# Altium PCB Mega2560_Custom.PcbDoc (part 6 of 6)
Units mil, origin at the board's own origin, x right, y up, seen from the top; angles counter-clockwise.
Board outline 4742.41 x 2889.95 mil, 2 copper layers (Top Layer, Bottom Layer), stack 57 mil thick; 213 components, 133 nets, 789 pads, 812 vias.
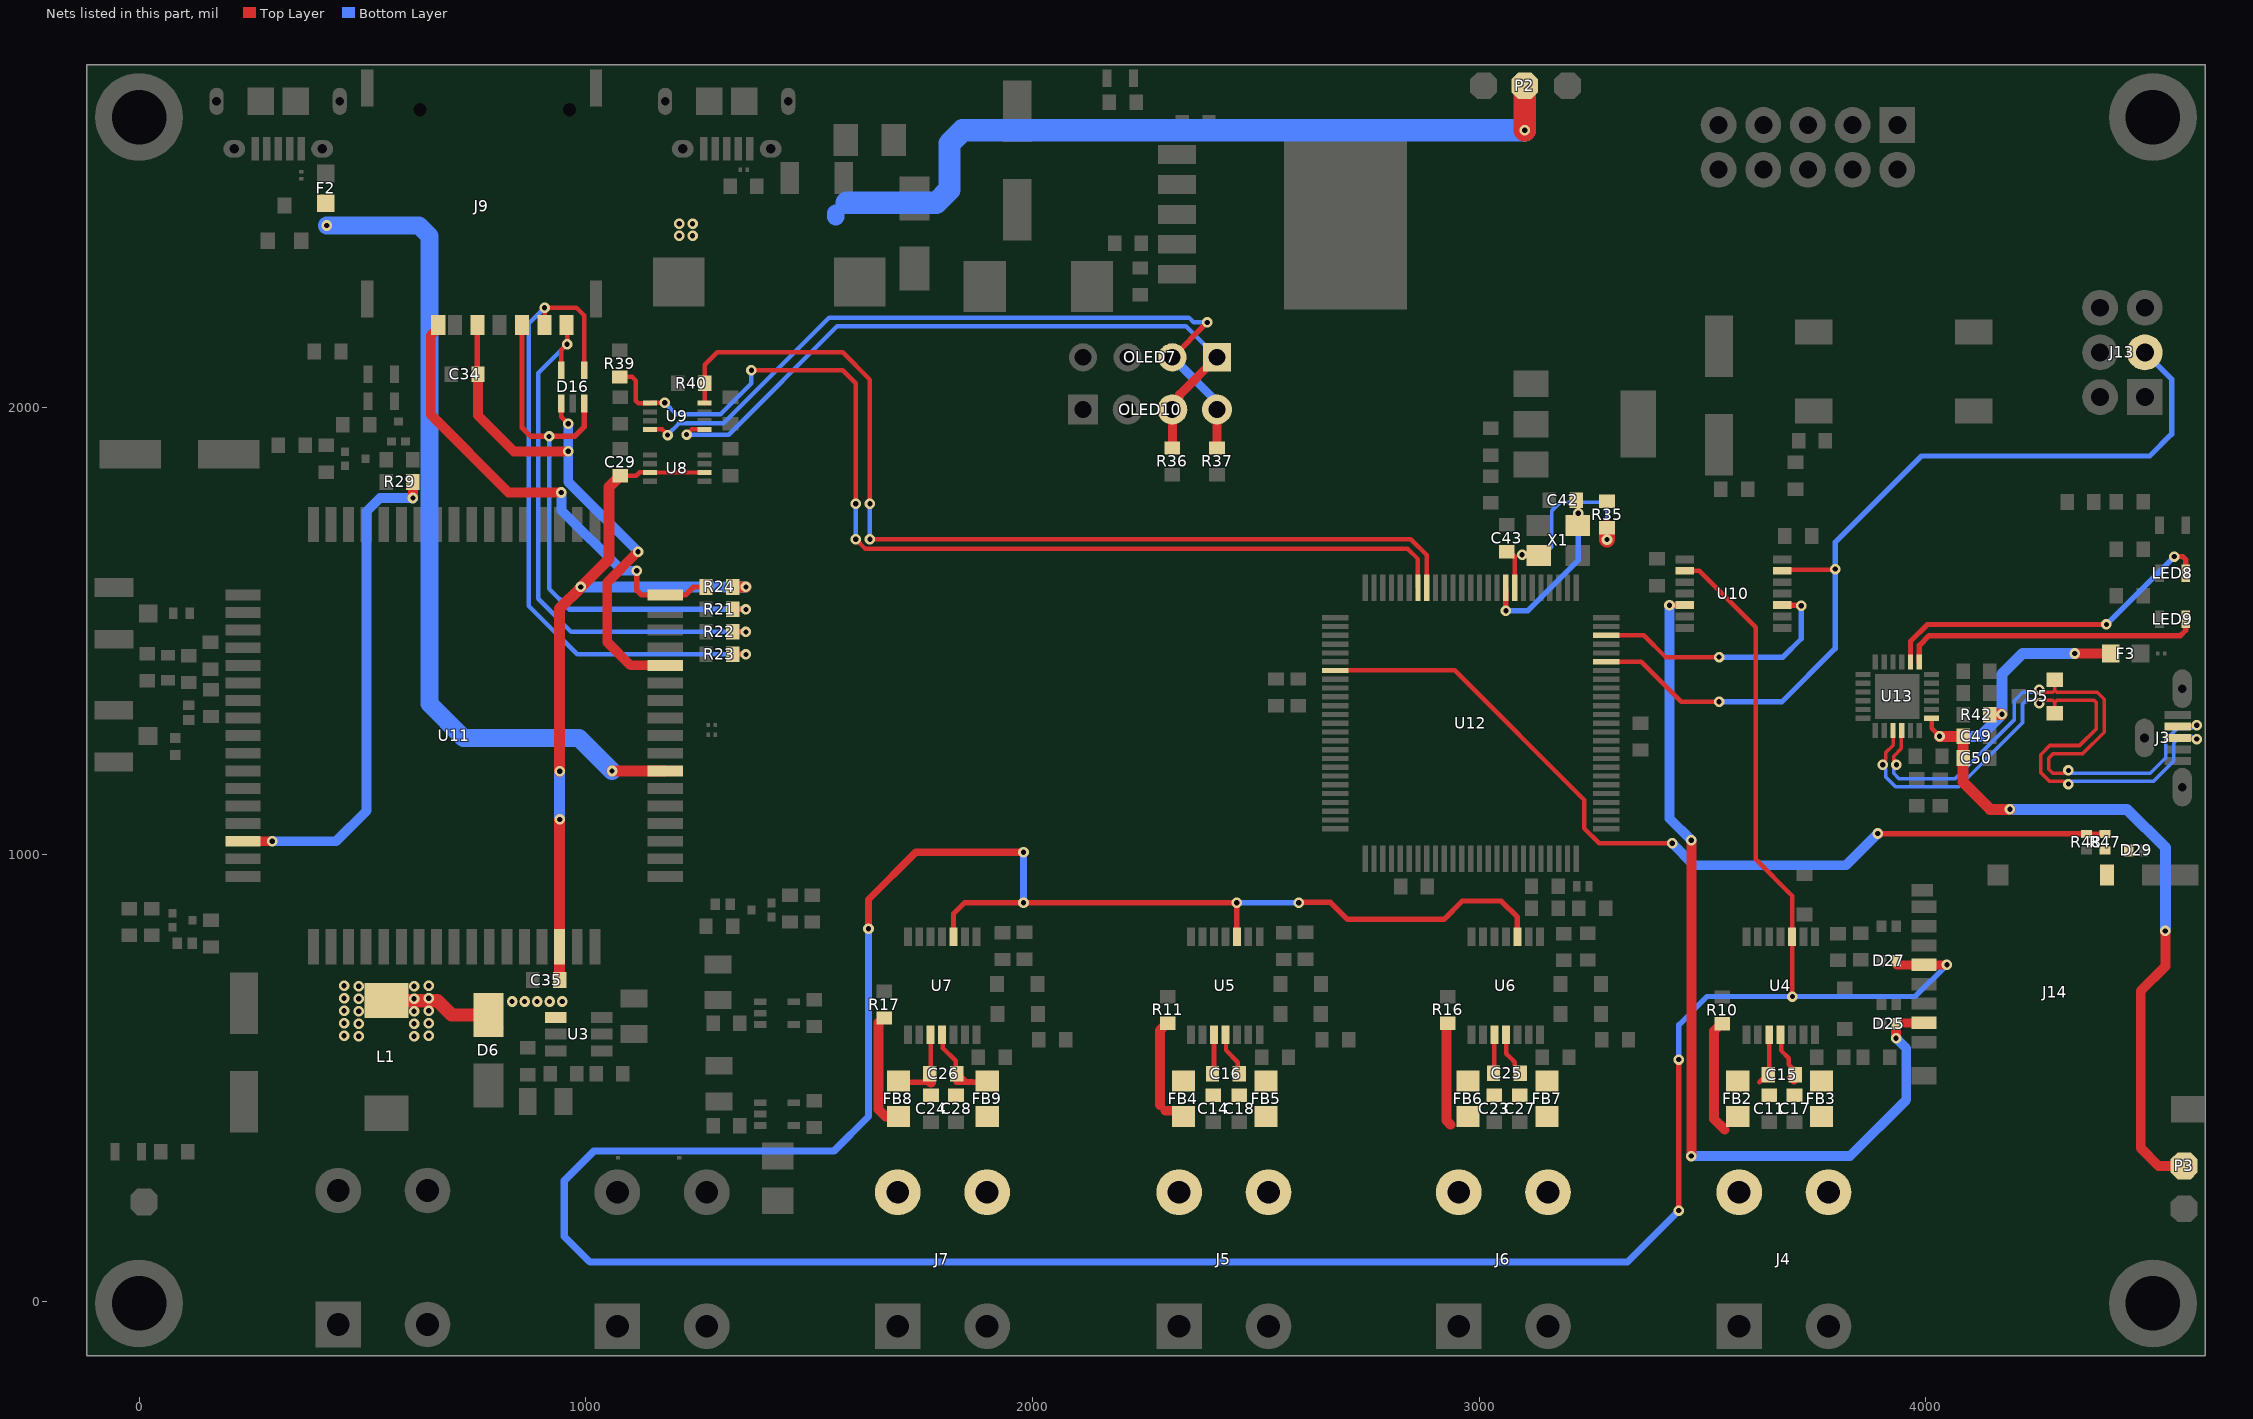
[diagram p3: the nets of this part, all layers, seen from the top]

## Via types
v1: diameter 23.62, hole 11.81, Top Layer to Bottom Layer, 812 vias

## Nets (pads, with @x,y where several pads share a name; then routed paths per layer and width w, separated by ;. In a path a pad name is that pad's centre, name@x,y a point inside that pad or via, vN(x,y) a via of type N, cw(c..) or ccw(c..) an arc to the next point about the centre after c; other vN are vias at no path point) (continued)
RXLED: LED9.2 U13.13 | length 675.3
  Top Layer w12: U13.13@3985.17,1430.85 3985.17,1468.17 4007,1490 4569.5,1490 4581.53,1502.03 LED9.2@4581.53,1527
  Top Layer w16: LED9.2@4579.69,1525.16 LED9.2@4581.53,1527
SCK: J13.3 U10.13 U12.20 | length 2022.6
  Top Layer w10: U12.20@3283.97,1431.59 3362.41,1431.59 3452.05,1341.95 v1(3536.82,1341.95) ; U10.13@3678.07,1635.13 3679.98,1637.04 3798.91,1637.04 v1@3800.82,1638.95
  Bottom Layer w12: v1(3536.82,1341.95) 3677.82,1341.95 3796.82,1460.95 v1(3796.82,1638.95) 3796.82,1698.82 3990,1892 4500.87,1892 4549.82,1940.95 4549.82,2063.95 J13.3@4489.82,2123.95
SCK_3.3V: D27.1 J14.5 U4.10 U5.10 U6.10 U7.10 U10.2 | length 8170.6
  Top Layer w10: U10.2@3459.57,1635.13 3492.64,1635.13 3619,1508.77 3619,989.15 3700.27,907.88 U4.10@3700.27,815.41 3701,814.68 v1(3701,682)
  Top Layer w12: U7.10@1823.23,815.41 1823.23,867.36 1847.82,891.95 v1(1979.82,891.95) ; v1@1979.87,892 v1(2457,892) ; U5.10@2457.41,815.41 v1@2457.41,891.59 ; v1(2596,892) 2596.94,892.94 2667.06,892.94 2705,855 2921,855 2962,896 3049,896 3085.27,859.73 U6.10@3085.27,815.41 ; v1(3446.82,202.95) v1(3446.82,540.95)
  Top Layer w16: v1(1632.82,833.51) 1632.82,899.23 1738.54,1004.95 v1(1979.82,1004.95)
  Top Layer w20: D27.1@3934.74,752.96 J14.5@3995.52,752.97 v1(4046.82,752.95)
  Bottom Layer w12: v1(2457,892) v1(2596,892) ; v1(3446.82,540.95) 3446.82,618.82 3510,682 v1(3701,682) 3975.87,682 v1(4046.82,752.95)
  Bottom Layer w16: v1(1632.82,833.51) 1632.82,413.82 1554.95,335.95 1017.88,335.95 951.82,269.89 951.82,145.18 1009.05,87.95 3331.82,87.95 v1(3446.82,202.95) ; v1@1979.82,890.95 v1(1979.82,1004.95)
SCL_3.3V: OLED7.1 OLED10.3 R36.1 U9.5 | length 1606.6
  Top Layer w10: v1(1225.5,1939.95) 1236.97,1951.42 U9.5@1265.85,1951.42
  Top Layer w20: R36.1@2313,1910 OLED10.3@2313,1996 2313,2008.69 2329.38,2025.07 2329.38,2029.37 OLED7.1@2413,2113
  Bottom Layer w10: v1(1225.5,1939.95) 1319.82,1939.95 1562.82,2182.95 2343.05,2182.95 OLED7.1@2413,2113
SCL_5V: R40.1 U9.8 U12.43 | length 2184.2
  Top Layer w10: U9.8@1265.85,2010.48 1265.85,2054.85 R40.1@1266,2055 1266,2096 1294,2124 1575,2124 1636,2063 v1(1636,1785) ; v1(1636,1706) 2815,1706 2847,1706 2882.4,1670.6 U12.43@2882.4,1596.95
  Bottom Layer w10: v1(1636,1706) v1(1636,1785)
SD_CS: U10.10 U12.23 | length 591.3
  Top Layer w10: U12.23@3283.97,1490.65 3368.35,1490.65 3417.05,1441.95 v1(3536.82,1441.95)
  Top Layer w12: U10.10@3678.07,1558.36 3678.78,1557.65 3720.12,1557.65 v1(3720.82,1556.95)
  Bottom Layer w12: v1(3536.82,1441.95) 3679.82,1441.95 3720.82,1482.95 v1(3720.82,1556.95)
SD_CS_3.3V: D25.1 J14.2 U10.5 | length 2054.5
  Top Layer w12: v1(3425.82,1557.95) 3426.03,1558.15 3459.37,1558.15 U10.5@3459.57,1558.36
  Top Layer w20: D25.1@3938.95,623.05 J14.2@3995.52,623.05
  Top Layer w22: v1(3474.82,324.95) v1(3474.82,1031.81) ; v1(3933,589) D25.1@3933,619.27
  Bottom Layer w22: v1@3425.82,1557.51 3425.82,1080.81 v1(3474.82,1031.81) ; v1(3474.82,324.95) 3829.95,324.95 3956,451 3956,566 v1(3933,589)
SD_DET: D29.1 J14.SW-A R47.1
SDA_3.3V: OLED7.2 OLED10.4 R37.1 U9.4 | length 1720.9
  Top Layer w10: U9.4@1143.8,1951.42 1170.85,1951.42 1183,1939.27 v1(1183,1939)
  Top Layer w12: OLED7.2@2313,2113 v1(2391,2191)
  Top Layer w20: R37.1@2413,1910 OLED10.4@2413,1996
  Bottom Layer w10: v1(1183,1939) 1183,1939.44 1208.51,1964.95 1307.82,1964.95 1544.82,2201.95 2350.2,2201.95 2361.16,2191 v1(2391,2191)
  Bottom Layer w20: OLED7.2@2313,2113 2404.02,2021.89 2404.02,2004.98 OLED10.4@2413,1996
SDA_5V: R39.1 U9.1 U12.44 | length 2348.7
  Top Layer w10: R39.1@1076,2069 1104,2069 1112,2061 1112,2016.07 1117.86,2010.21 U9.1@1143.8,2010.21 ; U9.1@1144.27,2010.95 v1(1176.82,2010.95) ; v1(1370.82,2083.95) 1575.05,2083.95 1604,2055 v1(1604,1785) ; v1(1604,1706) 1626,1684 2840,1684 2862.71,1661.29 U12.44@2862.71,1596.95
  Bottom Layer w10: v1(1176.82,2010.95) 1201.82,1985.95 1301.82,1985.95 1370.82,2054.95 v1(1370.82,2083.95) ; v1(1604,1706) v1(1604,1785)
SDMMC_DET: R47.2 R48.1 U12.57 | length 1973
  Top Layer w10: U12.57@2677.67,1412.17 2944.83,1412.17 3235,1122 3235,1058.39 3268.44,1024.95 v1(3431.81,1024.95) v1@3433,1024.95
  Top Layer w12: v1(3892,1047) 3892.37,1046.63 4357.78,1046.63 4358.96,1045.45 R47.2@4400.96,1045.45
  Bottom Layer w22: v1@3431.5,1025.5 3481.05,975.95 3820.95,975.95 v1(3892,1047)
SIM_CLK: D16.5 J9.C3 R22.1 | length 1231.2
  Top Layer w10: D16.5@945.23,2084.35 945.23,2129.23 v1(958,2142) ; J9.C3@957.13,2185.45 958,2184.58 v1@958,2138.31
  Top Layer w12: R22.1@1329.18,1498.28 v1(1358.38,1498.28)
  Bottom Layer w10: v1(958,2142) 893.82,2077.82 893.82,1572.18 967.72,1498.28 v1(1358.38,1498.28)
SIM_DATA: D16.4 J9.C7 R23.1 | length 1498.7
  Top Layer w10: J9.C7@907.82,2186.15 v1(907.82,2223.95) 979.05,2223.95 996.41,2206.59 D16.4@996.41,2084.35
  Top Layer w12: R23.1@1329.18,1447.95 v1(1358.38,1447.95)
  Bottom Layer w10: v1(907.82,2223.95) 871.82,2187.95 871.82,1556.95 980.82,1447.95 v1(1358.38,1447.95)
SIM_DET: J9.CD R24.2 U11.34 | length 1047.2
  Top Layer w12: v1(1114,1635.31) 1114,1592 1125.05,1580.95 U11.34@1177.7,1580.95 1222.95,1580.95 1240.95,1598.95 R24.2@1269.18,1598.95
  Top Layer w22: J9.CD@669.73,2185.45 669.73,2178.76 653,2162.03 653,1984.7 827.3,1810.4 v1(945.27,1810.4)
  Bottom Layer w22: v1(945.27,1810.4) 945.58,1810.09 945.58,1770.42 1080.69,1635.31 v1(1114,1635.31)
SIM_RST: D16.3 J9.C2 R21.1 | length 1268.2
  Top Layer w12: J9.C2@857.13,2185.45 857.13,1955.64 876.82,1935.95 v1(917.82,1935.95) 974.95,1935.95 996.41,1957.41 D16.3@996.41,2009.55 ; R21.1@1329.18,1548.62 v1(1358.38,1548.62)
  Bottom Layer w10: v1(917.82,1935.95) 917.82,1594.95 942.39,1570.39
  Bottom Layer w12: 942.39,1570.39 964.16,1548.62 v1(1358.38,1548.62)
SIM_VDD: C34.2 D16.1 J9.C1 U11.30 | length 1223.5
  Top Layer w10: C34.2@757.13,2076.64 C34.2@758.82,2074.95 ; D16.1@945.23,2009.55 945.03,2009.34 945.03,1979.74 v1(960.82,1963.95)
  Top Layer w12: C34.2@757.13,2076.64 J9.C1@757.13,2185.45
  Top Layer w22: C34.2@758.82,2074.95 758.82,1982.95 839.32,1902.45 v1(960.82,1902.45) ; v1(1117,1678) 1048,1609 1048,1476 1100.53,1423.47 U11.30@1177.7,1423.47
  Bottom Layer w22: v1(960.82,1963.95) v1(960.82,1902.45) 960.82,1834.18 v1(1117,1678)
STATUS: R29.2 U11.66 | length 1126.9
  Top Layer w22: U11.66@232.82,1029.77 v1(298,1029.77) ; v1(613,1798) R29.2@613,1834
  Bottom Layer w22: v1(298,1029.77) 440.77,1029.77 508.82,1097.82 508.82,1767.82 539,1798 v1(613,1798)
SW_12V: D6.2 L1.2 U3.1 | length 279.7
  Top Layer w30: L1.2@553.82,672.93 668.07,672.93 700.31,640.69 D6.2@781.82,640.69 781.82,628.46 D6.2@800.29,610
  other v1: 492,593 615.65,593 459,594 648.65,594 492,621 615.65,621 459,622 648.65,622 492,649 615.65,649 459,650 648.65,650 835,671 863,671 891,671 919,671 947,671 492,677 615.65,677 459,678 648.65,678 492,705 615.65,705 459,706 648.65,706
TH1_CON+: FB3.1 J4.4 | length 2.8
  Top Layer w40: FB3.1@3765.82,413.95 FB3.1@3766.82,412.95 ; J4.4@3780.82,244.95 J4.4@3781.82,243.95
TH1_CON-: FB2.1 J4.2 R10.1 | length 256.1
  Top Layer w22: R10.1@3543.82,620.95 3541.32,620.95 3525.42,605.05 3525.42,408.22 3549.64,384
TH1_T+: C15.2 C17.1 FB3.2 U4.4 | length 124.1
  Top Layer w10: U4.4@3675.67,582.92 3675.67,561.33 3692.91,544.09 3692.91,529.95 3701.88,520.97 3706,520.97 3698.05,520.97 3698.05,509.46 C15.2@3705.89,501.62 ; C15.2@3693.32,499.95 3703.32,489.95 C15.2@3705.82,489.95
TH1_T-: C11.2 C15.1 FB2.2 U4.3 | length 103.2
  Top Layer w10: 3626.87,489.91 3649.09,512.13 U4.3@3649.09,583.91
TH2_CON+: FB7.1 J6.4
TH2_CON-: FB6.1 J6.2 R16.1 | length 234.5
  Top Layer w22: R16.1@2927.32,621.95 R16.1@2929.82,621.95 2926.81,618.94 2926.81,404.19 2936,395
TH2_T+: C25.2 C27.1 FB7.2 U6.4 | length 93.8
  Top Layer w10: U6.4@3060.67,582.92 3060.67,554.15 3068.66,546.16 3079.56,535.25 3079.56,512.95 C25.2@3090.89,501.62
TH2_T-: C23.2 C25.1 FB6.2 U6.3 | length 73.9
  Top Layer w10: C25.1@3034.09,510 U6.3@3034.09,583.91
TH3_CON+: FB5.1 J5.4 | length 4.8
  Top Layer w40: J5.4@2522.82,247.35 J5.4@2526.22,243.95
TH3_CON-: FB4.1 J5.2 R11.1 | length 249.7
  Top Layer w22: 2285,439.18 2285,606.63 2300.32,621.95 R11.1@2302.82,621.95 ; 2297.89,426.29 2322.84,426.29 2334.12,415 FB4.1@2334.12,414.25
  Top Layer w40: J5.2@2326.22,243.95 J5.2@2337.82,255.55
TH3_T+: C16.2 C18.1 FB5.2 U5.4 | length 88.1
  Top Layer w10: U5.4@2432.8,582.92 2433.08,582.65 2433.08,561.78 2459.57,535.29 2459.57,516.43 C16.2@2467,509
TH3_T-: C14.2 C16.1 FB4.2 U5.3 | length 88.2
  Top Layer w10: C16.1@2406.23,509.77 C16.1@2407,509
  Top Layer w12: C16.1@2406.23,509.77 U5.3@2406.23,596.91
TH4_CON+: FB9.1 J7.4 | length 0.6
  Top Layer w40: J7.4@1898.42,243.95 J7.4@1898.62,244.15 ; FB9.1@1898.62,413.75 FB9.1@1898.82,413.95
TH4_CON-: FB8.1 J7.2 R17.1 | length 263.4
  Top Layer w22: 1655.02,441.81 1655.02,428.95 1670.72,413.25 FB8.1@1699.12,413.25 ; 1655,441.84 1655,623.63 1665.32,633.95 R17.1@1667.82,633.95
  Top Layer w40: J7.2@1698.42,243.95 J7.2@1699.12,244.65
TH4_T+: C26.2 C28.1 FB9.2 U7.4 | length 199.4
  Top Layer w8: FB9.2@1896.08,489.95 FB9.2@1898.82,492.69
  Top Layer w10: U7.4@1797.64,583.91 1799.24,582.31 1799.24,566.76 1827.86,538.14 1827.86,511.14 C26.2@1830,509 1830,491.13 1828.82,489.95 ; C26.2@1842.99,501.62 1851.66,492.95 1865.8,492.95
  Top Layer w12: 1828.82,489.95 1859.82,489.95 ; 1865.8,489.95 FB9.2@1896.08,489.95
TH4_T-: C24.2 C26.1 FB8.2 U7.3 | length 136.9
  Top Layer w10: C26.1@1772.05,509 U7.3@1772.05,583.91
  Top Layer w12: FB8.2@1699.82,489.95 1759.82,489.95
  Top Layer w22: 1771.41,490.36 1772.82,488.95
TXLED: LED8.2 U13.14 | length 774.2
  Top Layer w12: U13.14@3965.35,1430.72 3965.35,1477.35 4003,1515 v1(4404,1515) ; v1(4556,1667) 4574.5,1667 4581.53,1659.97 LED8.2@4581.53,1630
  Bottom Layer w12: v1(4404,1515) v1(4556,1667)
USB_D_N: D5.2 J3.2 U13.4 | length 1389.1
  Top Layer w8: 3927.51,1211.49 3927.51,1220.07 3944.82,1237.38 3944.82,1276.33 U13.4@3945.67,1277.18 ; v1(4253.82,1369.26) 4258.05,1369.26 4264.36,1362.95 4283.51,1362.95 4288.19,1367.63 ; D5.2@4288.19,1391.35 4288.19,1367.63 ; v1(4318.82,1188.26) 4314.6,1188.26 4308.28,1181.95 4283.82,1181.95 4274.82,1190.95 4274.82,1215.95 4284.82,1225.95 4351.28,1225.95 4398.82,1273.49 4398.82,1347.72 4383.59,1362.95 4292.88,1362.95 4288.19,1367.63 ; J3.2@4563.82,1286.54 4565.08,1287.8 4604.56,1287.8 v1(4605.82,1289.05)
  Bottom Layer w8: v1(3933.82,1200.95) 3933.82,1196.72 3927.51,1190.41 3927.51,1181.82 3939.39,1169.95 4065.82,1169.95 4198,1302.13 4198,1344.13 4216.82,1362.95 4243.28,1362.95 ; v1@4326.35,1181.95 4501.82,1181.95 4536.82,1216.95 4536.82,1256.4 4563.16,1282.74 4595.28,1282.74 4601.6,1289.05 v1(4605.82,1289.05)
USB_D_P: D5.1 J3.3 U13.3 | length 1418.9
  Top Layer w8: 3909.51,1211.49 3909.51,1227.53 3926.82,1244.84 3926.82,1276.33 U13.3@3925.98,1277.18 ; v1(4253.82,1338.64) 4258.05,1338.64 4264.36,1344.95 4283.51,1344.95 4288.19,1340.26 ; D5.1@4288.19,1316.55 4288.19,1340.26 ; v1(4318.82,1157.64) 4314.6,1157.64 4308.28,1163.95 4276.37,1163.95 4256.82,1183.49 4256.82,1223.4 4277.37,1243.95 4343.82,1243.95 4380.82,1280.95 4380.82,1340.26 4376.14,1344.95 4292.88,1344.95 4288.19,1340.26 ; J3.3@4563.82,1260.95 4565.08,1259.69 4604.56,1259.69 v1(4605.82,1258.43)
  Bottom Layer w8: v1(3903.2,1200.95) 3903.2,1196.72 3909.51,1190.41 3909.51,1174.37 3931.93,1151.95 4073.28,1151.95 4216,1294.67 4216,1336.67 4224.28,1344.95 4243.28,1344.95 ; v1@4326.35,1163.95 4509.28,1163.95 4554.82,1209.49 4554.82,1248.95 4570.62,1264.74 4595.28,1264.74 4601.6,1258.43 v1(4605.82,1258.43)
USB_PRGM: C49.1 C50.1 F3.2 P3.1 R42.2 U13.7 | length 2064.7
  Top Layer w10: U13.7@4012.59,1304.74 4012.59,1282.41 v1(4030.5,1264.5)
  Top Layer w22: v1@4333.03,1449.97 F3.2@4413.36,1449.95 ; 4480.82,694.77 4480.82,342.95 4520.82,302.95 P3.1@4577.82,302.95 ; 4481.31,694.77 4481.62,694.77 4482.36,695.52 4482.36,696.31 4535.82,749.77 v1(4535.82,828.95)
  Top Layer w25: v1(4030.5,1264.5) C49.1@4083,1264.5 C50.1@4083,1216 4083,1162 4144,1101 v1(4188,1101) ; R42.2@4143,1313 4144,1314 v1(4170,1314)
  Bottom Layer w25: v1(4030.5,1264.5) 4120.5,1264.5 v1(4170,1314) 4170,1404 4216,1450 v1(4333,1450) ; v1(4188,1101) 4450,1101 4535.82,1015.18 v1(4535.82,828.95)
USB_VBUS: F2.2 P2.1 U11.24 | length 3629.2
  Top Layer w22: v1(1058.82,1186.95) v1@1058.97,1187.1 ; U11.24@1177.55,1187.1 U11.24@1177.7,1187.25
  Top Layer w25: v1@1058.97,1187.1 U11.24@1177.55,1187.1
  Top Layer w50: v1(3101.82,2620.95) P2.1@3101.82,2720.95
  Bottom Layer w40: v1(420,2408) 626.57,2408 650,2384.57 650,1337.43 726.43,1261 984.77,1261 v1(1058.82,1186.95) ; 1559.5,2427.5 1559.5,2434.5
  Bottom Layer w50: 1584.25,2459 1784.71,2459 1814,2488.29 1814,2591.66 1843.29,2620.95 v1(3101.82,2620.95)
  other v1: 1209.18,2384.95 1239,2384.95 1209.18,2412 1239,2412
VDD_EXT: C29.1 C35.2 R24.1 U8.3 U8.6 U11.15 | length 1775.6
  Top Layer w10: C29.1@1076.82,1847.95 1112.82,1847.95 1120.46,1855.58 1143.32,1855.58 U8.3@1143.8,1855.11 U8.6@1265.85,1855.11
  Top Layer w25: C35.2@941.48,719 U11.15@941.48,793.55 v1(941.48,1078.61) ; v1(941.48,1186.29) 941.48,1550.48 v1@989,1598 ; v1(989,1598.95) 1051.82,1661.77 1051.82,1822.95 1071.82,1842.95 1071.82,1845.45 1074.32,1847.95 C29.1@1076.82,1847.95 ; R24.1@1329.18,1598.95 v1(1358.38,1598.95)
  Bottom Layer w25: v1(941.48,1078.61) v1(941.48,1186.29) ; v1@989.95,1598.95 v1(1358.38,1598.95)
XTAL1: C42.2 R35.2 U12.34 X1.1 | length 364.9
  Top Layer w12: U12.34@3059.56,1596.95 3059.66,1596.85 3059.66,1546.11 v1(3059.82,1545.95)
  Bottom Layer w12: v1(3059.82,1545.95) 3108.82,1545.95 3222,1659.13 3222,1693 ; 3221.82,1693 v1(3221.82,1763.82)
XTAL2: C43.1 R35.1 U12.33 X1.3 | length 462.2
  Top Layer w10: C43.1@3077,1670 3079.25,1667.75 U12.33@3079.25,1596.95
  Top Layer w35: v1(3286,1705) R35.1@3286,1731
  Bottom Layer w8: v1(3095.82,1670.95) 3144.82,1670.95 3161.82,1687.95 3161.82,1768.82 3182,1789 3272,1789 3286,1775 v1(3286,1705)
pads on no net: J1.2 J1.3 J1.4 J2.4 J3.4 J4.1 J4.3 J5.1 J5.3 J6.1 J6.3 J7.1 J7.3 J9.C6 J9.MH J11.1 J11.3 J12.7 J12.8 J14.1 J14.8 J15.1 J15.3 SW1.2 SW1.4 U3.6 U4.6 U4.13 U5.6 U5.13 U6.6 U6.13 U7.6 U7.13 U10.6 U10. U11.3 U11.4 U11.5 U11.6 U11.7 U11.8 U11.11 U11.12 U11.13 U11.14 U11.19 U11.20 U11.21 U11.22 U11.23 U11.25 U11.26 U11.35 U11.36 U11.37 U11.38 U11.40 U11.41 U11.42 U11.43 U11.44 U11.47 U11.48 U11.49 U11.50 U11.51 U11.67 U11.68 U12.1 U12.4 U12.5 U12.6 U12.7 U12.8 U12.9 U12.12 U12.13 U12.14 U12.15 U12.16 U12.17 U12.18 U12.19 U12.24 U12.25 U12.27 U12.28 U12.29 U12.35 U12.36 U12.37 U12.38 U12.39 U12.40 U12.41 U12.42 U12.47 U12.48 U12.49 U12.50 U12.51 U12.52 U12.58 U12.59 U12.60 U12.63 U12.64 U12.65 U12.66 U12.67 U12.68 U12.69 U12.70 U12.79 U12.82 U12.83 U12.84 U12.85 U12.86 U12.87 U12.88 U12.89 U12.94 U12.95 U13.1 U13.10 U13.11 U13.12 U13.15 U13.16 U13.17 U13.18 U13.19 U13.22 U13.24
copper on no net:
  other v1: 4248.05,577.77 3961,1578 3961,1685 257.77,2515.72

## Polygon pours and split planes (outlines as drawn)
GND on Top Layer "GND_L02_P001" (solid, remove dead copper, pour order 4): -16,-23 -16,2670 4527,2670 4527,-23
GND on Bottom Layer "GND_L02_P001" (solid, remove dead copper, pour order 0): -16,-23 -16,2670 4527,2670 4527,-23

## Other copper
Top Layer:
  region net 3.3V: 4372,691 4372,724 3968,724 3968,691
  region net 3.3V: 4370,398 4370,441 3867,441 3867,398
  region net 3.3V: 4613,172 4613,240 4333.96,240 4333.96,172
  rectangle net 3.3V: 4334.13,197 4376.13,1028
  rectangle net SCL_3.3V: 2277,1893 2351,2037
  rectangle net SDA_3.3V: 2377,1893 2451,2034
  rectangle net 12V: -30,178 499,303
  rectangle net SIM_DET: 641,2151 686,2210
  rectangle net SIM_VDD: 739,2013 777,2209
  region net 3.3V: 2859,1819 2859,1877 1895,1877 1895,1819
  rectangle net 3.3V: 2790,1844.15 2859,1999
  rectangle net USB_VBUS: 1107.73,2368 1174.73,2535
  region net USB_VBUS: 1117.15,2435.27 1117.15,2368.27 1270.15,2368.27 1270.15,2435.27
  region net GND: 967.44,2289.9 967.44,2234 1047,2234 1047,2289.9
  region net GSM_PWR: 611,2449 543,2449 543,2296 611,2296
  region net USB_VBUS: 527.9,2481.56 394,2481.56 394,2387.56 527.9,2387.56
  rectangle net GSM_PWR: 968,2298 1094,2431
  rectangle net GSM_PWR: 543,2394 1094,2455
  rectangle net GND: 365.82,2201.95 528,2288
  rectangle net GND: 2065,1948 2158,2163
  rectangle net 3.3V: 2174,1839 2257.18,2152
  rectangle net GND: 3883,503 3906,621
  rectangle net GND: 1001,2615 1192,2674
  rectangle net GND: 4127,1338 4230,1381
  rectangle net ADC1/IN: 1376,437.07 1437,473
  rectangle net ADC0/IN: 1376,663.07 1437,699
  region net GND: 930,436 930,332 1084.07,332 1084.07,436
  rectangle net 5V: 3335,1207.05 3501,1250.82
  region net 5V: 1528.95,494 1451,494 1451,433 1528.95,433
  region net ADC0: 1301,603 1301,694 1268,694 1268,603
  rectangle net ADC1/IN: 1251.62,227.95 1465,262.95
  region net ADC1/IN: 1290,325 1185,325 1185,301 1290,301
  region net ADC1/IN: 1289.62,224.95 1289.62,325 1254.62,325 1254.62,224.95
  region net 5V: 1613,730 1451,730 1451,659 1613,659
  region net ADC1: 1301,374 1301,467 1268,467 1268,374
  region net ADC0/IN: 1089,220 1089,326 1054,326 1054,220
  rectangle net 5V: 3236.18,909.05 3377,949
  region net 5VACC: 3204,949 3204,863 3231,863 3231,949
  region net 5V: 3334.05,1250.82 3334.05,1143 3386,1143 3386,1250.82
  region net GND: 3303,2058.95 3030.82,2058.95 3030.82,2020.95 3303,2020.95
  region net GND: 3042.95,1933.18 3042.95,2189 3004.95,2189 3004.95,1933.18
  rectangle net GND: 1300.18,1830.05 1390,1868.05
  region net GND: 1353.05,1981.82 1353.05,1833 1391.05,1833 1391.05,1981.82
  region net NetD12_2: 3301,783 3222,783 3222,744 3301,744
  rectangle net GND: 3131,745 3210,784
  rectangle net GND: 357,1838 471,1880
  rectangle net NetQ1_1: 357,1892 471,1934
  region net GND: 630,1866 630,1935 586,1935 586,1866
  region net NetQ2_1: 575,1816 575,1934.95 536,1934.95 536,1816
  region net GNSS_ANT: 35,1434 35,1562 -1,1562 -1,1434
  region net GSM_PWR: 132,1323 132,1378 87,1378 87,1323
  rectangle net NetL3_2: 0,1369.95 82,1410
  rectangle net NetL3_1: 48,1425.95 130,1463
  rectangle net GSM_PWR: 142,1369 257,1438
  rectangle net GND: 1406.69,880.98 1475,933
  rectangle net NetQ4_1: 1406.69,833 1524,870.92
  rectangle net GND: 1008,663 1115.69,699
  rectangle net NetQ3_1: -40.54,859 84,899
  rectangle net GND: 10,781 97,847
  rectangle net GNSS_ANT: 7.82,1517 90.82,1562
  region net NetD2_2: 443,2545 398,2545 398,2496 443,2496
  region net NetD2_2: 443,2523 443,2545 352,2545 352,2523
  rectangle net NetD2_2: 352,2525 374,2607
  region net GSM_PWR_EN: 2419,2656 2419,2468 2452,2468 2452,2656
  region net GSM_PWR_EN: 2444,2656 2373,2656 2373,2610 2444,2610
  region net 5V: 2361,2571 2361,2656 2280,2656 2280,2571
  rectangle net 5V: 2280,2544 2408,2590
  rectangle net GSM_PWR: 2080,2212 2264,2283
  rectangle net NetC55_2: 1355,2506 1381,2616
  rectangle net NetD3_2: 4465,1431 4523,1469
  rectangle net NetD3_2: 4521,1302 4595,1322
  rectangle net GND: 4531,1328 4609,1473
  rectangle net NetD7_1: 1525,2228 1782,2385
  rectangle net GND: 2213.82,2711.95 2314.82,2762.95
  rectangle net NetLED2_1: 2125,2660.95 2190.82,2762.95
  region net GSM_PWR: 2313,2705 2212,2705 2212,2661 2313,2661
  rectangle net 5V: 1874,2367 1999,2533
  rectangle net 5V: 1793,2367 1881,2580.52
  rectangle net 5V: 1873,2458 2054,2580.52
  rectangle net GND: 1834,2588.95 2082,2759.95
  rectangle net 5V: 1660,2549 1823,2636
  region net GND: 1945,2110 1945,2335.82 1840,2335.82 1840,2110
  rectangle net NetD7_1: 2099,2338 2158,2385
  rectangle net USB_VBUS: 395,2389 444,2479
  region net NetLED9_1: 4535,1503 4535,1597 4470,1597 4470,1503
  rectangle net NetJ13_2: 4327,1977 4439,2078
  rectangle net GND: 3883,603 3915,857
  rectangle net GND: 1254,819 1301,903
  rectangle net TH4_CON-: 1644,610 1691,650
  rectangle net TH3_CON-: 2274,598 2325,638
  rectangle net TH1_CON-: 3514.42,597 3566.17,637
  rectangle net 3.3V: 1859.82,526 1912.96,567
  rectangle net NetD15_2: 1866.14,572.95 1938.14,662.95
  rectangle net D\R\D\Y\4\: 1989,564 2033,664
  rectangle net 3.3V: 2494,526 2547.14,567
  rectangle net NetD11_2: 2499.14,572.95 2571.14,662.95
  rectangle net D\R\D\Y\3\: 2622,564 2666,664
  rectangle net TH2_CON-: 2899.62,598 2954,638
  rectangle net 3.3V: 3121.86,526 3175,567
  rectangle net NetD14_2: 3127,574 3199,664
  rectangle net D\R\D\Y\2\: 3249,564 3293,664
  rectangle net CS2: 3224,690 3288,734
  rectangle net GND: 3800.86,489.94 3906,514
  rectangle net GND: 3900,489.94 3946,565.94
  rectangle net TH1_T+: 3684.82,507 3727.18,534.95
  rectangle net TH2_T+: 3069.82,510 3110.86,528
  rectangle net TH4_T+: 1807.82,510.07 1848.86,528.07
  rectangle net TH3_T+: 2441.96,509 2483,527
  rectangle net SCK_3.3V: 3923,742.96 3957,776.96
  rectangle net GND: 3015.82,381.95 3111.82,436
  rectangle net GND: 2387,377.95 2483,417.95
  rectangle net SW_12V: 443,582 816,719
  rectangle net 5V: 406.18,320 703,540
  region net GND: 1207,699 1073,699 1073,637 1207,637
  rectangle net 5V: 1098,551 1179,586
  region net 5V: 1179,627 1073,627 1073,577 1179,577
  region net SW_12V: 961,686 806,686 806,621 961,621
  region net FB_12V: 938,490 938,574 899,574 899,490
  rectangle net GND: 951,409 1042,529
  rectangle net 12V: 718,514 845,542
  rectangle net FB_12V: 852,543 958,574
  rectangle net GND: 4477,926 4612,1060
  rectangle net GND: 4430.82,1044 4612,1216.95
  rectangle net GSM_PWR: 370,1980 421,2178
  rectangle net GSM_PWR: 210,1943 471,2026
  rectangle net NRESET: 1312,819 1381,904
  rectangle net USB_PRGM: 4001.82,1253 4051,1311
  rectangle net GND: 1626,2419 1775.85,2535
  rectangle net GND: 3321,1278 3381,1314
  rectangle net 5V: 2523,1279 2615,1350
  rectangle net 5V: 3671,1651.95 3714,1833
  region net NetLED8_1: 4535,1606 4535,1704 4470,1704 4470,1606
  rectangle net CP_VDD: 4404,1558 4443,1703
  rectangle net XTAL2: 3268.5,1715 3303.5,1751
  rectangle net XTAL1: 3192,1771 3307,1814.95
  rectangle net GND: 1183,2475 1350,2542
  rectangle net NetC55_2: 1355,2475 1478,2543
  rectangle net NetF1_2: 1540,2478 1614,2635
  rectangle net 5V: 1056,2112 1229,2210
  rectangle net 5V: 1299,2006 1350,2101
  rectangle net GSM_PWR: 1057,2228 1270,2358.95
  rectangle net USB_VBUS: 466,2474 1123,2535
  rectangle net VDD_EXT: 1039,1813.95 1098.82,1869.95
  rectangle net 3.3V: 3077,1919 3321,2002
  rectangle net 5V: 3004,1831 3253,1907.95
  rectangle net GND: -101,1578 51,2069.71
  rectangle net GND: 96,570 370,683
  rectangle net 12V: 741,483 817,542
  rectangle net 3.3V: 3376.94,1650.95 3484.82,1690
  rectangle net 3.3V: 3339,1798.95 3569,2040
  rectangle net GSM_PWR: 118,1667 186,1794
  rectangle net NetD7_1: 2279,2467 2405,2529
  rectangle net GSM_PWR: 118,1781 272,2027
  rectangle net 3.3V: 4311.82,996.76 4372.82,1027.76
  rectangle net GND: 294,596 370,706
  rectangle net GND: 96,587 319,742.95
  rectangle net GND: 3018,2054 3575.82,2576.95
  rectangle net GND: 2787.82,2186 3049.82,2576.95
  region net GND: -43.18,390.95 -75.18,390.95 -75.18,310.95 -43.18,310.95
  region net NetLED1_1: 68,357 -5.18,357 -5.18,310.95 68,310.95
  rectangle net 5V: 697,313.95 883.82,403
  rectangle net 5V: 1142,2031 1229,2210
  region net GND: 1369.82,1982.95 1302.82,1982.95 1302.82,1944.95 1369.82,1944.95
  rectangle net GND: 4567.82,437.95 4609.82,937.95
  rectangle net GND: 2463.82,2183 2839.82,2691.95
  rectangle net GND: 4430.82,1192.95 4514.82,1292.95
  rectangle net GND: 3575,1800.95 3633,2075.95
  rectangle net 3.3V: 3127.04,791 3262,840
  rectangle net GND: 1010.82,2008.95 1094.82,2039.95
  rectangle net GND: 1009,2008.95 1047,2284
  rectangle net GND: 1000,2652 1849,2709.95
  rectangle net GND: 1183,2531.95 1273.82,2666.95
  rectangle net GND: 153.97,2533.95 268.82,2634.95
  region net GND: 557,2634.95 384.03,2634.95 384.03,2556 557,2556
  rectangle net GND: 153.97,2620.95 557,2709.95
  rectangle net NetLED6_1: 4470,1716 4533,1808
  rectangle net NetJ13_2: 4358,1766 4399,2068
  rectangle net GND: 3472.82,2054.52 3803.82,2427.95
  rectangle net TH1_CON+: 3736.42,191.95 3838,439.95
  rectangle net TH1_CON+: 3729.42,191.95 3754.42,298.95
  region net TH1_CON-: 3612,438 3514.42,438 3514.42,191.95 3612,191.95
  region net TH1_CON-: 3634.22,298.95 3596,298.95 3596,191.95 3634.22,191.95
  rectangle net TH2_CON+: 3122.62,191.95 3212.62,439.95
  rectangle net TH2_CON+: 3101.62,191.95 3126.62,298.95
  region net TH2_CON-: 3006.42,439 2899.62,439 2899.62,191.95 3006.42,191.95
  region net TH2_CON-: 3006.42,298.95 2981.42,298.95 2981.42,191.95 3006.42,191.95
  rectangle net TH4_CON+: 1867.02,191.95 1957.02,439.95
  rectangle net TH4_CON+: 1846.02,191.95 1871.02,298.95
  region net TH4_CON-: 1740,438 1644.02,438 1644.02,191.95 1740,191.95
  region net TH4_CON-: 1750.82,298.95 1725.82,298.95 1725.82,191.95 1750.82,191.95
  region net TH3_CON-: 2380.62,298.95 2355.62,298.95 2355.62,191.95 2380.62,191.95
  region net TH3_CON-: 2369,439.95 2273.82,439.95 2273.82,191.95 2369,191.95
  rectangle net TH3_CON+: 2475.82,191.95 2500.82,298.95
  rectangle net TH3_CON+: 2495.82,191.95 2585.82,438
  rectangle net 5V: 3615,1651.95 3700.82,1734.95
  rectangle net XTAL2: 3043.82,1644.95 3161.82,1692.95
  rectangle net GND: 2898,1711.95 3161.21,1816
  rectangle net GND: 3156.82,1763.95 3174.82,1814.95
  rectangle net GND: 3134,1711.95 3174.82,1814.95
  rectangle net XTAL1: 3191.82,1711.95 3247.82,1814.95
  rectangle net R\E\S\E\T\: 3677,1960.95 3801,2022.95
  rectangle net R\E\S\E\T\: 3677,1863 3731.82,1990.95
  rectangle net GND: 3842.82,1087.95 3874.82,1247.95
  rectangle net GND: 3842.82,1087.95 4052.82,1128.95
  rectangle net GND: 3629,383 3725,423
  region net TH1_T-: 3670.87,534.95 3549.87,534.95 3549.87,445.95 3670.87,445.95
  rectangle net TH1_T+: 3684.82,445.95 3794,517.95
  region net TH2_T-: 3055.87,530 2946,530 2946,448 3055.87,448
  rectangle net TH2_T+: 3069.82,446 3179,517.95
  region net TH3_T-: 2428,527 2307,527 2307,445 2428,445
  rectangle net TH3_T+: 2441.96,445 2554,517.95
  rectangle net TH4_T+: 1807.82,446 1925.82,517
  region net TH4_T-: 1793.82,530 1672.82,530 1672.82,446 1793.82,446
  rectangle net 3.3V: 2499.82,790 2630,841
  rectangle net GND: 1753.4,377.95 1849.4,417.95
  rectangle net 3.3V: 1865.82,787.95 2060,841
  rectangle net CP_VDD: 3959.82,1152.95 4054.82,1239
  rectangle net CP_VDD: 4012.82,1152.95 4054.82,1237.95
  rectangle net CP_VDD: 3959.82,1153.95 3991.82,1292.95
  rectangle net GND: 4136.82,909.3 4184.82,934.95
  rectangle net SD_DET: 4387,930.17 4466,1028.98
  rectangle net 5V: 1288.67,1880 1344.82,1926.95
  region net GSM_PWR: 2091,2326 2010,2326 2010,2212 2091,2212
  rectangle net GND: 153.97,2696.95 1850,2759.95
  region net GND: 114.33,1172.95 114.33,1227.92 -86.67,1227.92 -86.67,1172.95
  rectangle net GND: -100.18,1301.95 -13.18,1502.95
  rectangle net GND: 1007.82,663 1064.82,829.95
  rectangle net 12V: 718,415 891.82,525
  rectangle net 12V: 91,224 368.44,540
  rectangle net 3.3V: 3742.82,794 3874,844
  rectangle net GND: 573.82,1613.95 639.82,1778.95
  rectangle net GND: 64.82,1050.95 275.82,1240.95
  rectangle net GSM_PWR: 87,1353 181,1410
  rectangle net GSM_PWR: 188,1368.95 318,1480.95
  rectangle net RF_ANT: 12.82,1249.36 272.82,1281.36
  rectangle net NetC39_1: 97,1524.95 272.82,1556.95
  region net NetLED4_2: 599,1959 599,2038.95 560,2038.95 560,1959
  rectangle net GSM_FB: 2218.82,2293.95 2262.82,2356.95
  rectangle net GSM_FB: 2218.82,2336.95 2372.82,2392.95
  pour cut-out: 39,1640 39,1152 -114,1152 -114,1640
  pour cut-out: 1140.46,2213.82 1343.23,2082.71 1480.29,2082.71 1686.46,2216.02 1686.46,2347.29 1485.95,2474.71 1337.54,2474.71 1140.46,2347.29
Bottom Layer:
  rectangle net GSM_PWR: 374,2287 611,2370
  rectangle net GND: 2070,1951 2156,2130
  rectangle net 5V: 2519,1279.95 2750,1353
  rectangle net 3.3V: 2790,1922 3247,1999
  rectangle net 5V: 2976,1802 3310,1910
  rectangle net GND: 2896,1711 2969,1817
  rectangle net 5V: 1870,2431 2406.68,2554.95
  rectangle net 5V: 1870,2522.95 2406.68,2587.95
  rectangle net GND: 1837,2095 2156,2169
  rectangle net SW_12V: 816,621 962,687
  rectangle net SW_12V: 443,582 828.47,719
  rectangle net 5V: 1084,551 1179,627
  rectangle net GND: 4554,966 4613,1023
  rectangle net GND: 308,597.95 349,705
  rectangle net GND: 1000,2620 1273.82,2762.95
  rectangle net GND: 158,2682 465,2719
  rectangle net 5V: 2395,2519 3219,2588
  rectangle net 5V: 2164,2214 2406,2449
  rectangle net USB_VBUS: 1187,2369 1595,2486
  rectangle net GND: 3565,1838.95 3639,2024
  rectangle net 5V: 3605,1651 3714,1740
  rectangle net GND: 3401,2111 3607,2237
  rectangle net GSM_PWR: 116,1667 185,1719
  rectangle net GSM_PWR: 229,1934 469.82,2028
  rectangle net NetD7_1: 1621,2336 2157,2392
  rectangle net 3.3V: 3403,1646 3518,2022
  rectangle net GND: 2853.58,2218 3002,2513
  rectangle net GSM_PWR: 119,1801 236,2028
  rectangle net GND: -81,1788 42,1994
  rectangle net 12V: 147.82,416.95 780.82,540
  rectangle net GND: 4545.82,1312.02 4609.24,1415.95
  rectangle net GND: 4463.82,1312.02 4609.24,1373
  region net GND: 4520.44,1325.58 4463.82,1325.58 4463.82,1217.95 4520.44,1217.95
  rectangle net 5V: 1076,1901 1105.82,2254
  rectangle net 5V: 1080.82,1901 1333.82,1922
  rectangle net GND: 2860.82,2218.95 3292.82,2514
  rectangle net GND: 3008,2115 3293.82,2377.95
  rectangle net GND: 1246.82,2637.95 1683.82,2762.95
  rectangle net GND: 2308.82,2653.95 2839.82,2762.95
  rectangle net 5V: 3741.82,1949.95 3857.82,2030.95
  rectangle net GND: 1627,2654.05 2083,2722
  rectangle net GSM_PWR: 1187,2260 1256,2358.95
  rectangle net GSM_PWR: 1200.82,2260.95 2081,2330
  rectangle net 5V: 1080.82,2047.95 1300.82,2255
  rectangle net GND: 1571,2652 2375,2762.95
  rectangle net GND: 1178,2497 1769,2709.95
  rectangle net 12V: 53.82,184 514,421.95
  rectangle net 5V: 534,313.95 883.82,403.95
  rectangle net 12V: 760,416.95 857,542
  rectangle net GND: 99,597.95 312,743.95
  rectangle net 12V: 53.82,296.95 314.82,540
  rectangle net GSM_PWR: 374,1968.95 469.82,2370
  rectangle net GND: 364.82,1291 414.82,1513.95
  rectangle net GSM_PWR: 99.82,1364.95 318,1483.95
  pour cut-out: 1140.46,2214.82 1343.23,2083.71 1480.29,2083.71 1686.46,2217.02 1686.46,2348.29 1485.95,2475.71 1337.54,2475.71 1140.46,2348.29
  pour cut-out: 405,699 705,699 705,395 405,395
  pour cut-out: 38.82,1641 38.82,1153 -114.18,1153 -114.18,1641

## Silkscreen, mask and mechanical layers (free items; w line width, h text height)
Top Overlay:
  lines w6: 381.47,1968.47 393,1980 433,1980
  lines w7: 3243,1817 3248,1822 3311,1822
  lines w8: 111,1472 111,1496 136,1521 136,1556 ; 129,1158 129,1279 ; 158,1113 158,1280 ; 160,1502 160,1592 ; 379,2534 396.55,2551.55 444,2551.55
  lines w10: 65,1360 65,1368 ; 989,484 1016,457 1100,457 ; 1036,1942 1048,1954 ; 1072,350 1072,357 ; 1181,2532 1328,2532 ; 1245,2493 1296,2493 ; 1353,1484 1389,1484 1404,1469 1404,1359 1385,1340 1373,1340 ; 1353,1562.9 1389,1562.9 1404,1577.9 1404,1687.9 1383.9,1708 1361,1708 ; 1652,519 1652,536 1660,544 1737,544 1751,530 ; 1674.65,368 1737.65,368 1746.15,376.5 ; 1855.5,376.5 1864,368 1927,368 ; 2286.95,515 2286.95,532 2294.95,540 2373.82,540 2383.82,530 ; 2308.65,368 2371.65,368 2380.15,376.5 ; 2340.5,1932.5 2353,1945 2473,1945 ; 2443,1909 2474,1909 ; 2489.5,376.5 2498,368 2561,368 ; 2921,523 2939,541 3002.82,541 3012.82,531 ; 2936.65,368 2999.65,368 3008.15,376.5 ; 3117.5,376.5 3126,368 3189,368 ; 3531.13,513 3531.13,530 3539.13,538 3618,538 3628,528 ; 3551.65,368 3614.65,368 3623.15,376.5 ; 3732.5,376.5 3741,368 3804,368 ; 4167,1299 4183,1283 4183,1240 4198,1225 ; 4170.5,1214.5 4188,1197 4188,1171 4200,1159 ; 4171,1345 4200.45,1315.55 4200.45,1293.55 4208,1286 ; 4335,1085 4386,1085 4402,1069
  text "GSM_PWR" at 2266.12,2709 h55
  text "BOARD" at 1038.89,2588 h39.37
  text "POWER" at 1038.89,2553 h39.37
  text "5V" at 3222.82,2534.42 h60 r90
  text "VBUS" at 3127.82,2523.74 h60 r90
  text "GSM UPDATES" at 83.44,2496 h39.37
  text "GSM_PWR" at 3038.82,2397.7 h60 r90
  text "JTAG" at 3327.82,2354.95 h60
  text "NanoSIM" at 505.82,2106.95 h60
  text "NETLIGHT" at 245.26,2051 h55
  text "STATUS" at 245.26,1994 h55
  text "RESET" at 3800,1907 h60
  text "ICSP HEADER" at 4241.82,1820.95 h60 r90
  text "SCL" at 2337,1680.74 h60 r90
  text "SDA" at 2438,1680.74 h60 r90
  text "GND" at 2137,1680 h60 r90
  text "3V3" at 2240,1680 h60 r90
  text "TRANSMIT" at 4269.42,1609 h50
  text "RECEIVE" at 4305.74,1500 h50
  text "PROG: HEADER" at 4441.82,1097 h60 r90
  text "D" at 4477,1033 h45
  text "D" at 3887,862 h45
  text "D" at 3889,783 h45
  text "D" at 3858,649 h45
  text "D" at 3857,608 h45
  text "MICRO SD CARD" at 3985.5,365 h60
  text "12V" at 242.32,307.95 h59.06
  text "GND" at 484.82,307.95 h59.06
  text "ADC0" at 867.82,307.95 h59.06
  text "ADC1" at 1224.64,307.95 h59.06
  text "-TH4+" at 1495.82,304.95 h59.06
  text "-TH3+" at 2123.62,304.95 h59.06
  text "-TH2+" at 2751.42,304.95 h59.06
  text "-TH1+" at 3379.22,304.95 h59.06
  text "USB_PRGM" at 4233.64,273.95 h60
  text "12V" at -92.11,263 h55
  text "3.3V" at 4391.29,181.95 h60
  text "Note:" at 3927,-52 h60
  text "D >> D25 to D29" at 3921.85,-111.64 h60
Bottom Overlay:
  drawing of 3075 lines, arcs and shapes, not listed
  text "ZERO CARBON FOOTPRINT" at 2416,1189 h38
Dimension:
  lines w10: 1541.82,372.95 1541.82,1271.45
Board Outline:
  lines w10: -117.18,-22 4625.23,-22 ; -117.18,-122 -117.18,2767.95 4625.23,2767.95 4625.23,-122 -117.18,-122 ; 2263.03,-224.18 2263.03,-224.18
Fabrication:
  drawing of 316 lines, arcs and shapes, not listed
  text "Layer" at 4803.5,2746.37 h60
  text "Name" at 5213.41,2746.37 h60
  text "Material" at 6143.16,2746.37 h60
  text "Thickness" at 7002.92,2746.37 h60
  text "Constant" at 7652.76,2746.37 h60
  text "Board Layer Stack" at 8222.62,2746.37 h60
  text "Top Overlay" at 5213.41,2626.37 h60
  text "Top Solder" at 5213.41,2506.37 h60
  text "Solder Resist" at 6143.16,2506.37 h60
  text "3.00mil" at 7002.92,2506.37 h60
  text "3.5" at 7652.76,2506.37 h60
  text "1" at 4803.5,2386.37 h60
  text "Top Layer" at 5213.41,2386.37 h60
  text "10.00mil" at 7002.92,2386.37 h60
  text "Dielectric 1" at 5213.41,2266.37 h60
  text "FR-4" at 6143.16,2266.37 h60
  text "37.00mil" at 7002.92,2266.37 h60
  text "4.8" at 7652.76,2266.37 h60
  text "2" at 4803.5,2146.37 h60
  text "Bottom Layer" at 5213.41,2146.37 h60
  text "10.00mil" at 7002.92,2146.37 h60
  text "Bottom Solder" at 5213.41,2026.37 h60
  text "Solder Resist" at 6143.16,2026.37 h60
  text "3.00mil" at 7002.92,2026.37 h60
  text "3.5" at 7652.76,2026.37 h60
  text "Bottom Overlay" at 5213.41,1906.37 h60
Drill Drawing:
  circle w10: c-8.38,4587.27 r20
  circle w10: c-8.38,4587.27 r33.33
  circle w10: c-8.38,4287.27 r33.33
  lines w10: -41.71,3353.94 24.96,3353.94 24.96,3420.61 -41.71,3420.61 -41.71,3353.94 ; -41.71,3503.94 24.96,3503.94 24.96,3570.61 -41.71,3570.61 -41.71,3503.94 ; -41.71,3653.94 -8.38,3670.61 24.96,3653.94 8.29,3687.27 24.96,3720.61 -8.38,3703.94 -41.71,3720.61 -25.04,3687.27 -41.71,3653.94 ; -41.71,3803.94 -41.71,3820.61 -25.04,3837.27 -41.71,3853.94 -41.71,3870.61 -25.04,3870.61 -8.38,3853.94 8.29,3870.61 24.96,3870.61 24.96,3853.94 8.29,3837.27 24.96,3820.61 24.96,3803.94 8.29,3803.94 -8.38,3820.61 -25.04,3803.94 -41.71,3803.94 ; -41.71,3987.27 -8.38,3953.94 24.96,3987.27 -8.38,4020.61 -41.71,3987.27 ; -41.71,4170.61 24.96,4170.61 -8.38,4103.94 -41.71,4170.61 ; -41.71,4420.61 -25.04,4420.61 -8.38,4403.94 8.29,4420.61 24.96,4420.61 8.29,4437.27 24.96,4453.94 8.29,4453.94 -8.38,4470.61 -25.04,4453.94 -41.71,4453.94 -25.04,4437.27 -41.71,4420.61 ; -41.71,4770.61 24.96,4770.61 -8.38,4703.94 -41.71,4770.61 ; -28.38,3367.27 11.62,3367.27 11.62,3407.27 -28.38,3407.27 -28.38,3367.27 ; -28.38,4757.27 11.62,4757.27 -8.38,4717.27 -28.38,4757.27
  lines w15: -101.5,3308.94 13476.67,3308.94 ; -101.5,4808.94 13476.67,4808.94 ; 449.38,3158.94 449.38,4958.94 ; 1049.22,3158.94 1049.22,4958.94 ; 2188.88,3158.94 2188.88,4958.94 ; 2694.76,3158.94 2694.76,4958.94 ; 3428.56,3158.94 3428.56,4958.94 ; 4928.11,3158.94 4928.11,4958.94 ; 5517.96,3158.94 5517.96,4958.94 ; 6263.76,3158.94 6263.76,4958.94 ; 7453.41,3158.94 7453.41,4958.94 ; 8307.17,3158.94 8307.17,4958.94 ; 9640.78,3158.94 9640.78,4958.94 ; 10974.39,3158.94 10974.39,4958.94 ; 12074.07,3158.94 12074.07,4958.94 ; -101.5,3158.94 13476.67,3158.94 13476.67,4958.94 -101.5,4958.94 -101.5,3158.94
  text "Symbol" at -11.5,4853.94 h72
  text "Count" at 494.38,4853.94 h72
  text "Hole Size" at 1094.22,4853.94 h72
  text "Plated" at 2233.88,4853.94 h72
  text "Hole Type" at 2739.76,4853.94 h72
  text "Drill Layer Pair" at 3473.56,4853.94 h72
  text "Via/Pad" at 4973.11,4853.94 h72
  text "Pad Shape" at 5562.96,4853.94 h72
  text "Template" at 6308.76,4853.94 h72
  text "Description" at 7498.41,4853.94 h72
  text "Hole Tolerance (+)" at 8352.17,4853.94 h72
  text "Hole Tolerance (-)" at 9685.78,4853.94 h72
  text "Hole Length" at 11019.39,4853.94 h72
  text "Routed Path Length" at 12119.07,4853.94 h72
  text "1" at 494.38,4703.94 h60
  text "0.500mm (19.69mil)" at 1094.22,4703.94 h60
  text "PTH" at 2233.88,4703.94 h60
  text "Slot" at 2739.76,4703.94 h60
  text "Top Layer - Bottom Layer" at 3473.56,4703.94 h60
  text "Pad" at 4973.11,4703.94 h60
  text "Rounded" at 5562.96,4703.94 h60
  text "r220_110h50_160r100" at 6308.76,4703.94 h60
  text "1.600mm (62.99mil)" at 11019.39,4703.94 h60
  text "1.100mm (43.31mil)" at 12119.07,4703.94 h60
  text "2" at 494.38,4553.94 h60
  text "0.500mm (19.69mil)" at 1094.22,4553.94 h60
  text "PTH" at 2233.88,4553.94 h60
  text "Slot" at 2739.76,4553.94 h60
  text "Top Layer - Bottom Layer" at 3473.56,4553.94 h60
  text "Pad" at 4973.11,4553.94 h60
  text "Rounded" at 5562.96,4553.94 h60
  text "r220_110h50_120r100" at 6308.76,4553.94 h60
  text "1.200mm (47.24mil)" at 11019.39,4553.94 h60
  text "0.700mm (27.56mil)" at 12119.07,4553.94 h60
  text "2" at 494.38,4403.94 h60
  text "0.750mm (29.53mil)" at 1094.22,4403.94 h60
  text "NPTH" at 2233.88,4403.94 h60
  text "Round" at 2739.76,4403.94 h60
  text "Top Layer - Bottom Layer" at 3473.56,4403.94 h60
  text "Pad" at 4973.11,4403.94 h60
  text "Rectangle" at 5562.96,4403.94 h60
  text "s0hn75" at 6308.76,4403.94 h60
  text "-" at 11019.39,4403.94 h60
  text "-" at 12119.07,4403.94 h60
  text "4" at 494.38,4253.94 h60
  text "0.500mm (19.69mil)" at 1094.22,4253.94 h60
  text "PTH" at 2233.88,4253.94 h60
  text "Slot" at 2739.76,4253.94 h60
  text "Top Layer - Bottom Layer" at 3473.56,4253.94 h60
  text "Pad" at 4973.11,4253.94 h60
  text "Rounded" at 5562.96,4253.94 h60
  text "r80_155h50_115r100" at 6308.76,4253.94 h60
  text "1.150mm (45.28mil)" at 11019.39,4253.94 h60
  text "0.650mm (25.59mil)" at 12119.07,4253.94 h60
  text "4" at 494.38,4103.94 h60
  text "0.550mm (21.65mil)" at 1094.22,4103.94 h60
  text "PTH" at 2233.88,4103.94 h60
  text "Slot" at 2739.76,4103.94 h60
  text "Top Layer - Bottom Layer" at 3473.56,4103.94 h60
  text "Pad" at 4973.11,4103.94 h60
  text "Rounded" at 5562.96,4103.94 h60
  text "r100_125h55_85r100" at 6308.76,4103.94 h60
  text "0.850mm (33.47mil)" at 11019.39,4103.94 h60
  text "0.300mm (11.81mil)" at 12119.07,4103.94 h60
  text "4" at 494.38,3953.94 h60
  text "3.100mm (122.05mil)" at 1094.22,3953.94 h60
  text "PTH" at 2233.88,3953.94 h60
  text "Round" at 2739.76,3953.94 h60
  text "Top Layer - Bottom Layer" at 3473.56,3953.94 h60
  text "Pad" at 4973.11,3953.94 h60
  text "Rounded" at 5562.96,3953.94 h60
  text "c500h310" at 6308.76,3953.94 h60
  text "-" at 11019.39,3953.94 h60
  text "-" at 12119.07,3953.94 h60
  text "8" at 494.38,3803.94 h60
  text "0.950mm (37.40mil)" at 1094.22,3803.94 h60
  text "PTH" at 2233.88,3803.94 h60
  text "Round" at 2739.76,3803.94 h60
  text "Top Layer - Bottom Layer" at 3473.56,3803.94 h60
  text "Pad" at 4973.11,3803.94 h60
  text "(Mixed)" at 5562.96,3803.94 h60
  text "(Mixed)" at 6308.76,3803.94 h60
  text "-" at 11019.39,3803.94 h60
  text "-" at 12119.07,3803.94 h60
  text "16" at 494.38,3653.94 h60
  text "1.020mm (40.16mil)" at 1094.22,3653.94 h60
  text "PTH" at 2233.88,3653.94 h60
  text "Round" at 2739.76,3653.94 h60
  text "Top Layer - Bottom Layer" at 3473.56,3653.94 h60
  text "Pad" at 4973.11,3653.94 h60
  text "(Mixed)" at 5562.96,3653.94 h60
  text "(Mixed)" at 6308.76,3653.94 h60
  text "-" at 11019.39,3653.94 h60
  text "-" at 12119.07,3653.94 h60
  text "24" at 494.38,3503.94 h60
  text "1.300mm (51.18mil)" at 1094.22,3503.94 h60
  text "PTH" at 2233.88,3503.94 h60
  text "Round" at 2739.76,3503.94 h60
  text "Top Layer - Bottom Layer" at 3473.56,3503.94 h60
  text "Pad" at 4973.11,3503.94 h60
  text "(Mixed)" at 5562.96,3503.94 h60
  text "(Mixed)" at 6308.76,3503.94 h60
  text "-" at 11019.39,3503.94 h60
  text "-" at 12119.07,3503.94 h60
  text "812" at 494.38,3353.94 h60
  text "0.300mm (11.81mil)" at 1094.22,3353.94 h60
  text "PTH" at 2233.88,3353.94 h60
  text "Round" at 2739.76,3353.94 h60
  text "Top Layer - Bottom Layer" at 3473.56,3353.94 h60
  text "Via" at 4973.11,3353.94 h60
  text "Rounded" at 5562.96,3353.94 h60
  text "v60h30" at 6308.76,3353.94 h60
  text "-" at 11019.39,3353.94 h60
  text "-" at 12119.07,3353.94 h60
  text "877 Total" at 494.38,3203.94 h60
  text "Slot definitions :" at -11.5,3058.97 h60
  text "Routed Path Length" at 1021.19,3058.97 h60
  text "= Calculated from tool start centre position to tool end centre position." at 2123.86,3058.97 h60
  text "Hole Length" at 1021.19,2958.99 h60
  text "= Routed Path Length + Tool Size = Slot length as defined in the PCB layout" at 1713.99,2958.99 h60

## Dimensions
-117.18,-122 to -117.18,2767.95 on Dimension
4625.23,-122 to -117.18,-122 on Dimension

## Text inside footprints (layer, text, board x,y; h text height)
J1: Top Overlay "Board Edge" at 1217,2736.56 h19.68
J2: Top Overlay "Board Edge" at 404.88,2751.69 h19.68 r180
J4: Top Overlay "PCB Edge" at 3396.82,-66.8 h15.75
J5: Top Overlay "PCB Edge" at 2143.22,-66.8 h15.75
J6: Top Overlay "PCB Edge" at 2769.02,-66.8 h15.75
J7: Top Overlay "PCB Edge" at 1513.42,-66.8 h15.75
J9: Top Overlay "Board Edge" at 921.97,2719.81 h30 r180
J11: Top Overlay "PCB Edge" at 885.62,-66.8 h15.75
J15: Top Overlay "PCB Edge" at 260.82,-62.8 h15.75